# Altium PCB PCB1.PcbDoc
Units mil, origin at the board's own origin, x right, y up, seen from the top; angles counter-clockwise.
Board outline 2045 x 3100 mil, 4 copper layers (L1, L2, L3, L4), stack 62.315 mil thick; 56 components, 27 nets, 155 pads, 92 vias.
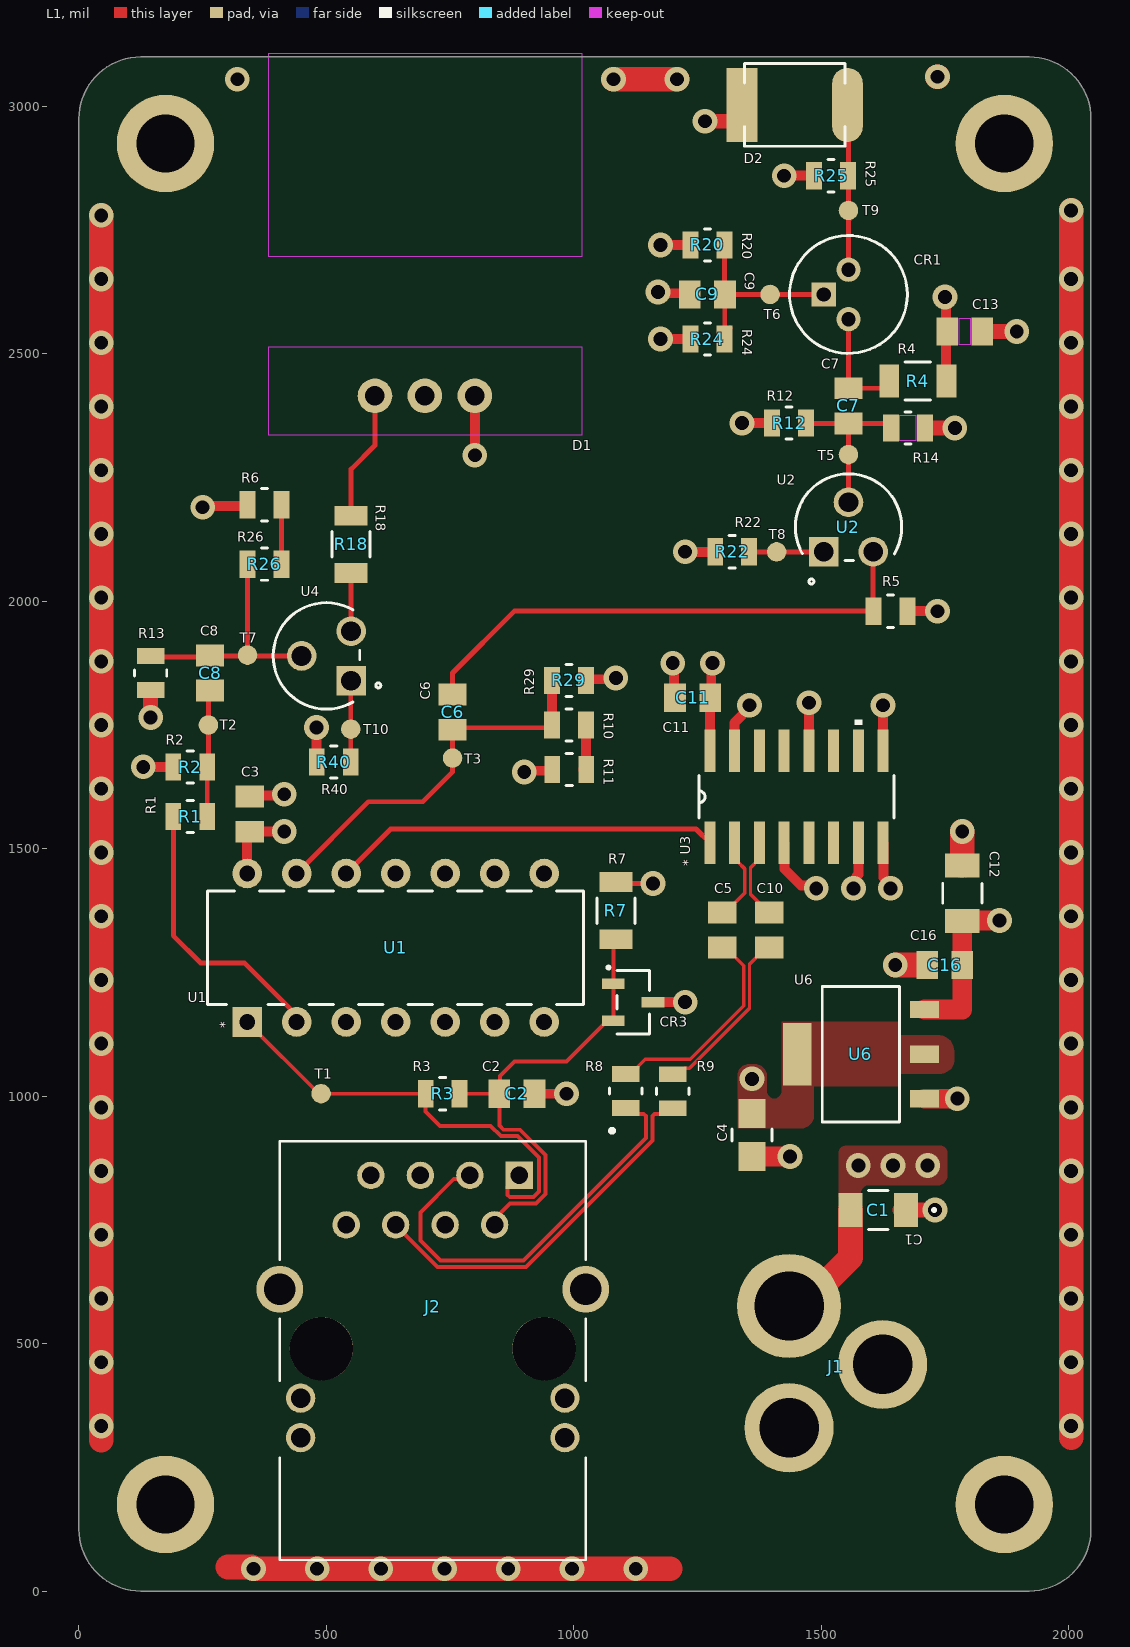
[diagram p0: L1 view]
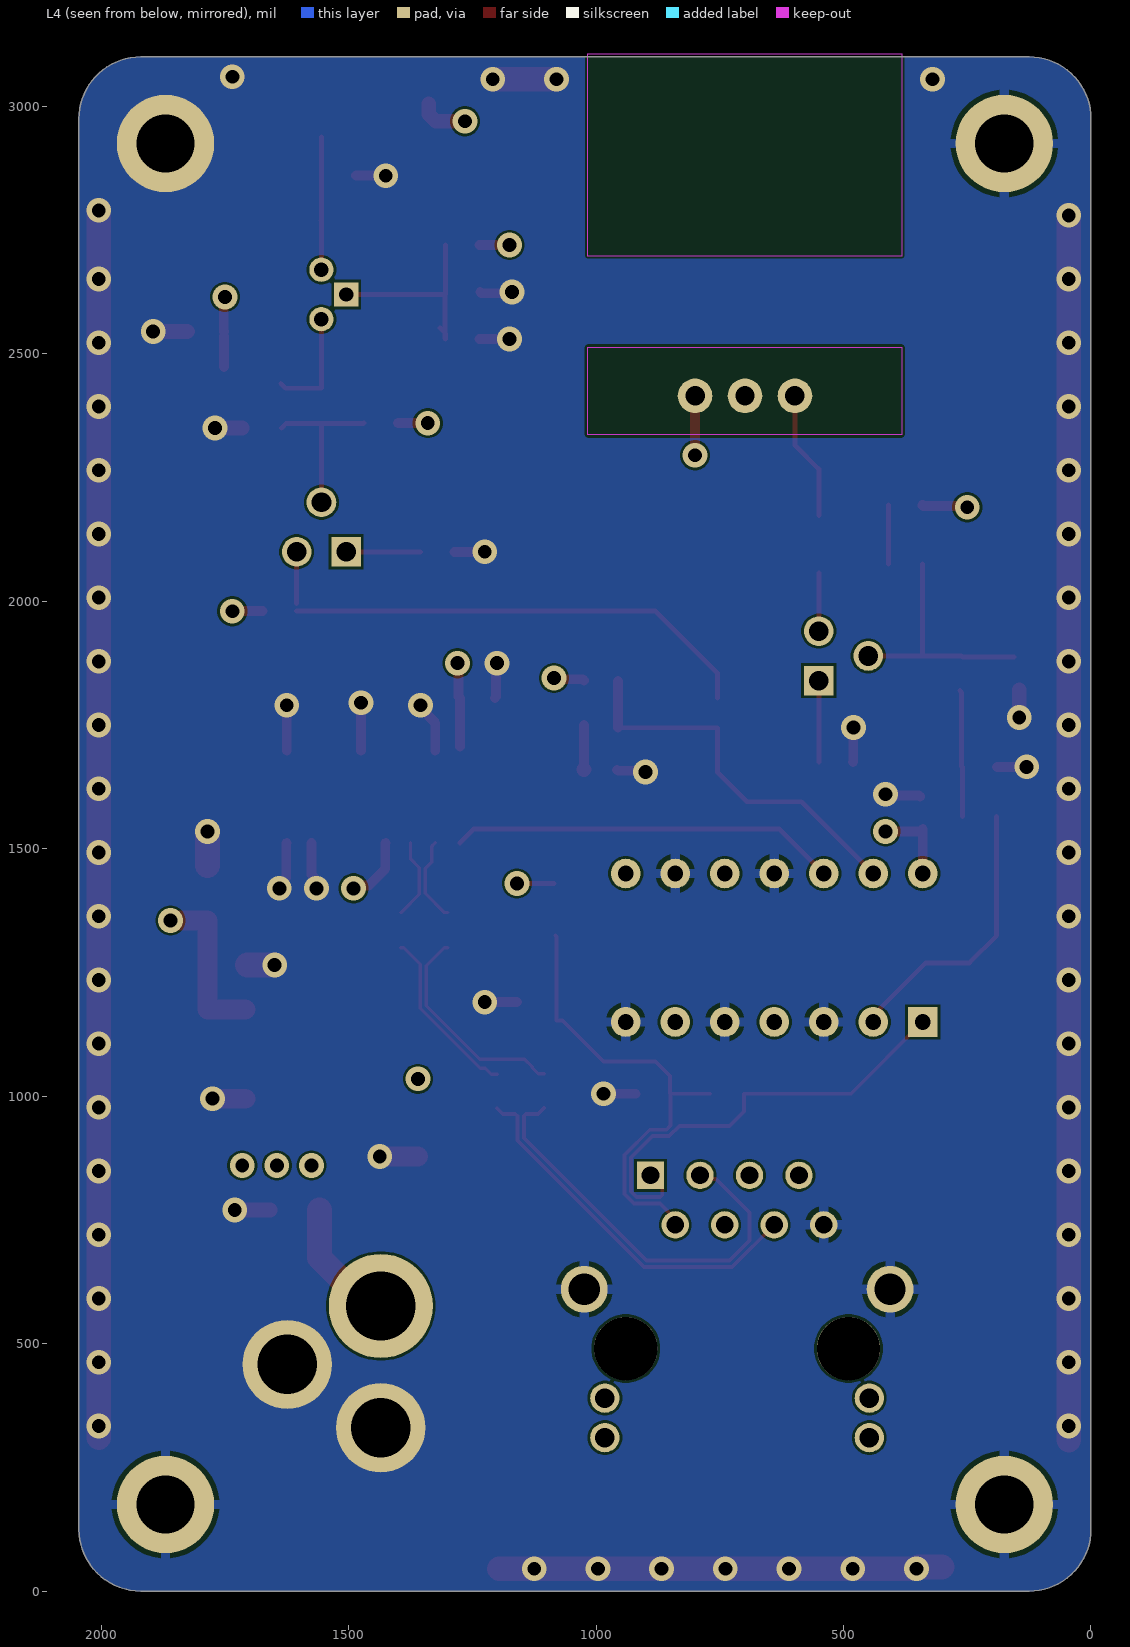
[diagram p1: L4 view, seen from below]
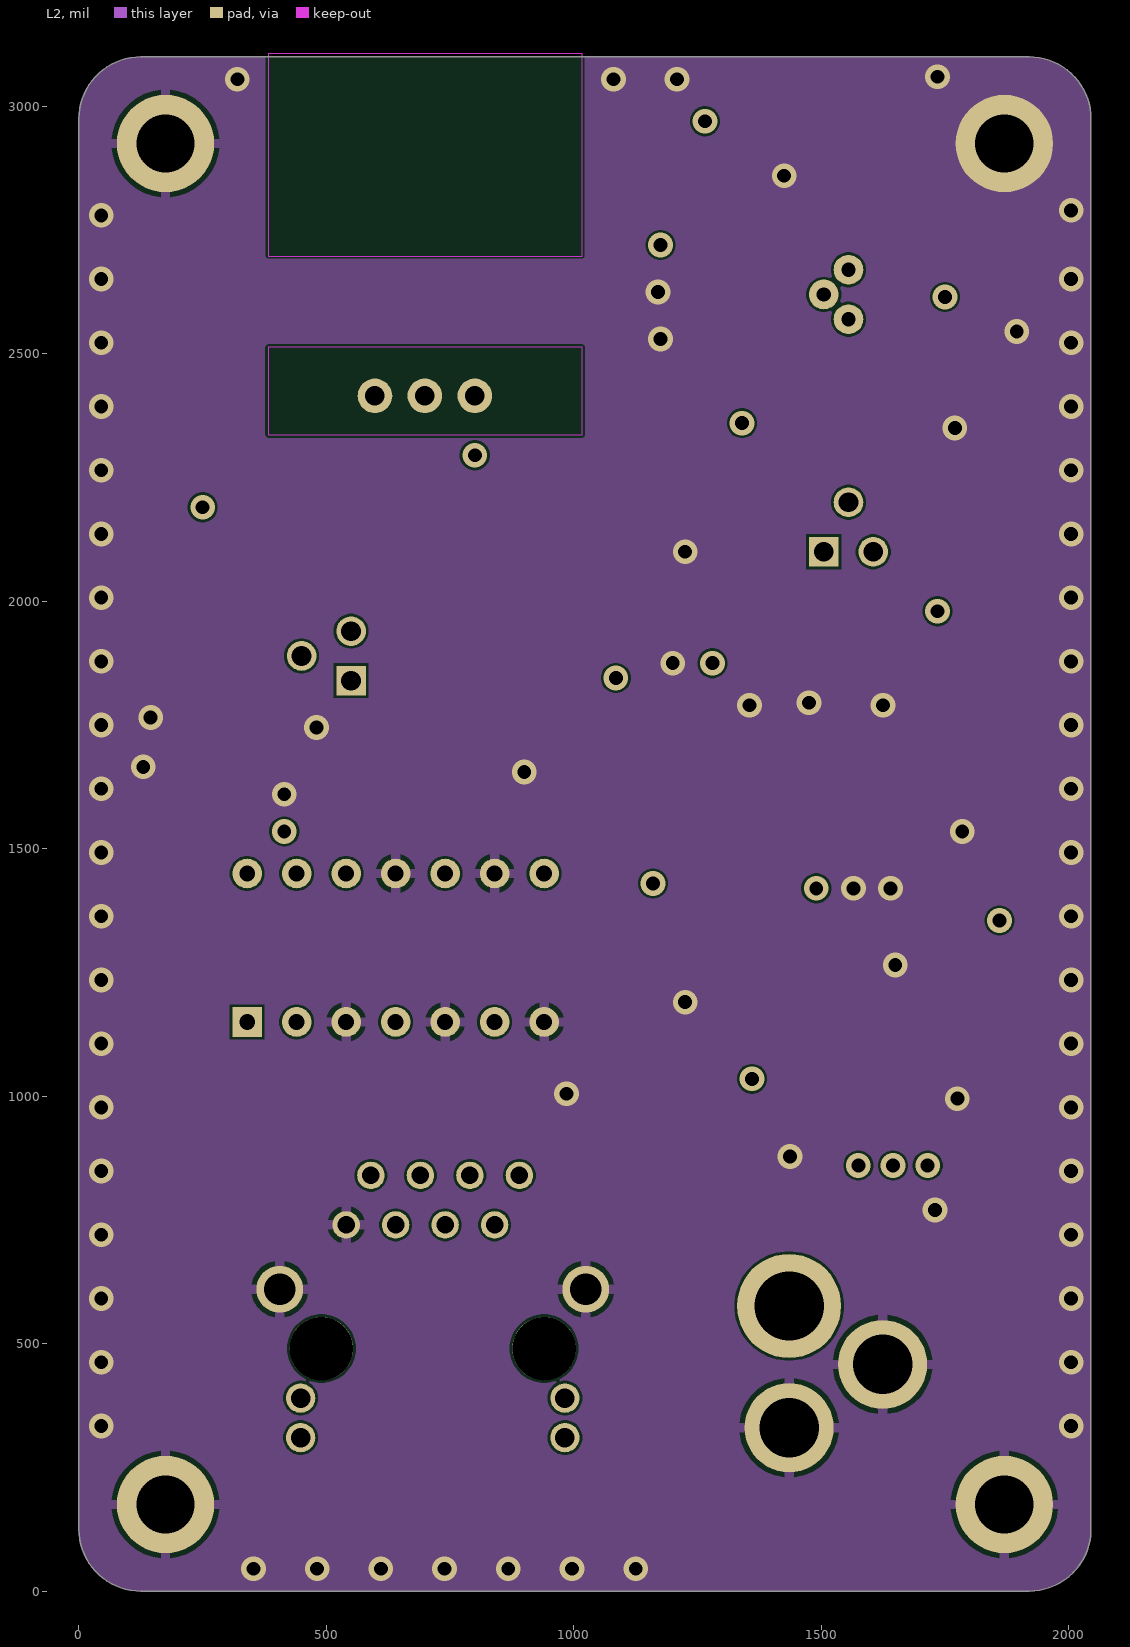
[diagram p2: L2]
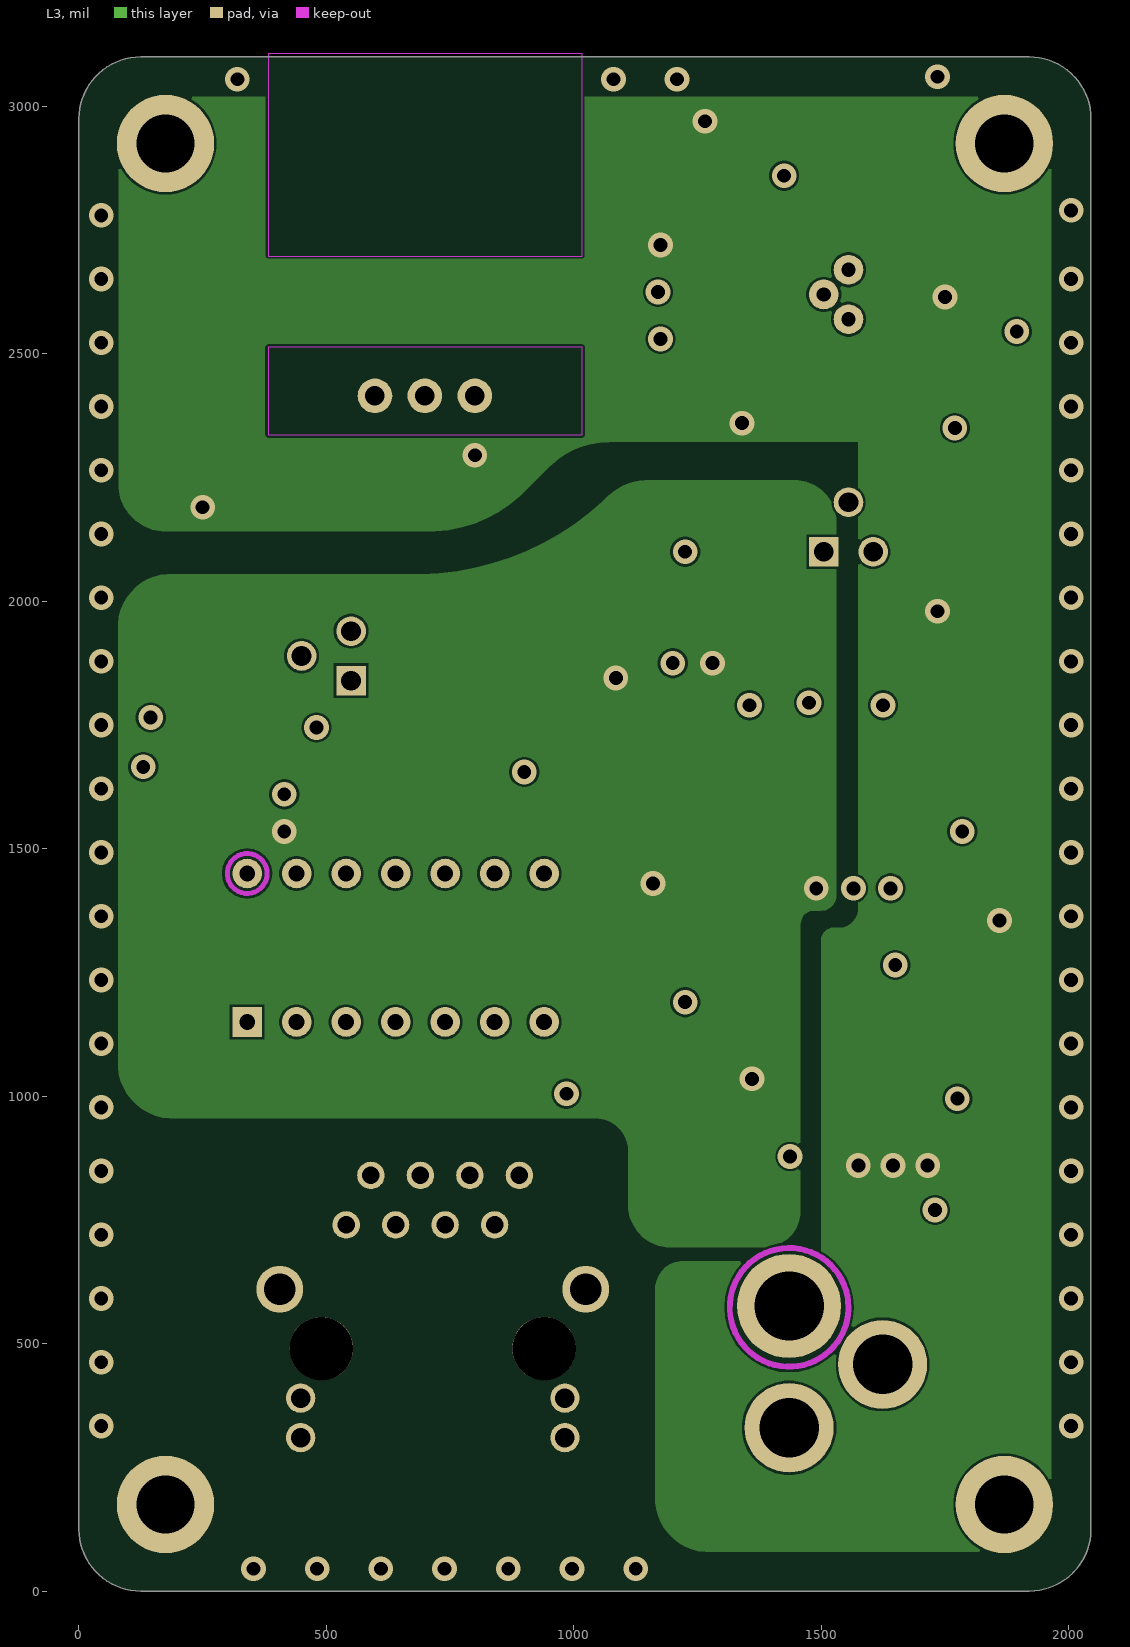
[diagram p3: L3]
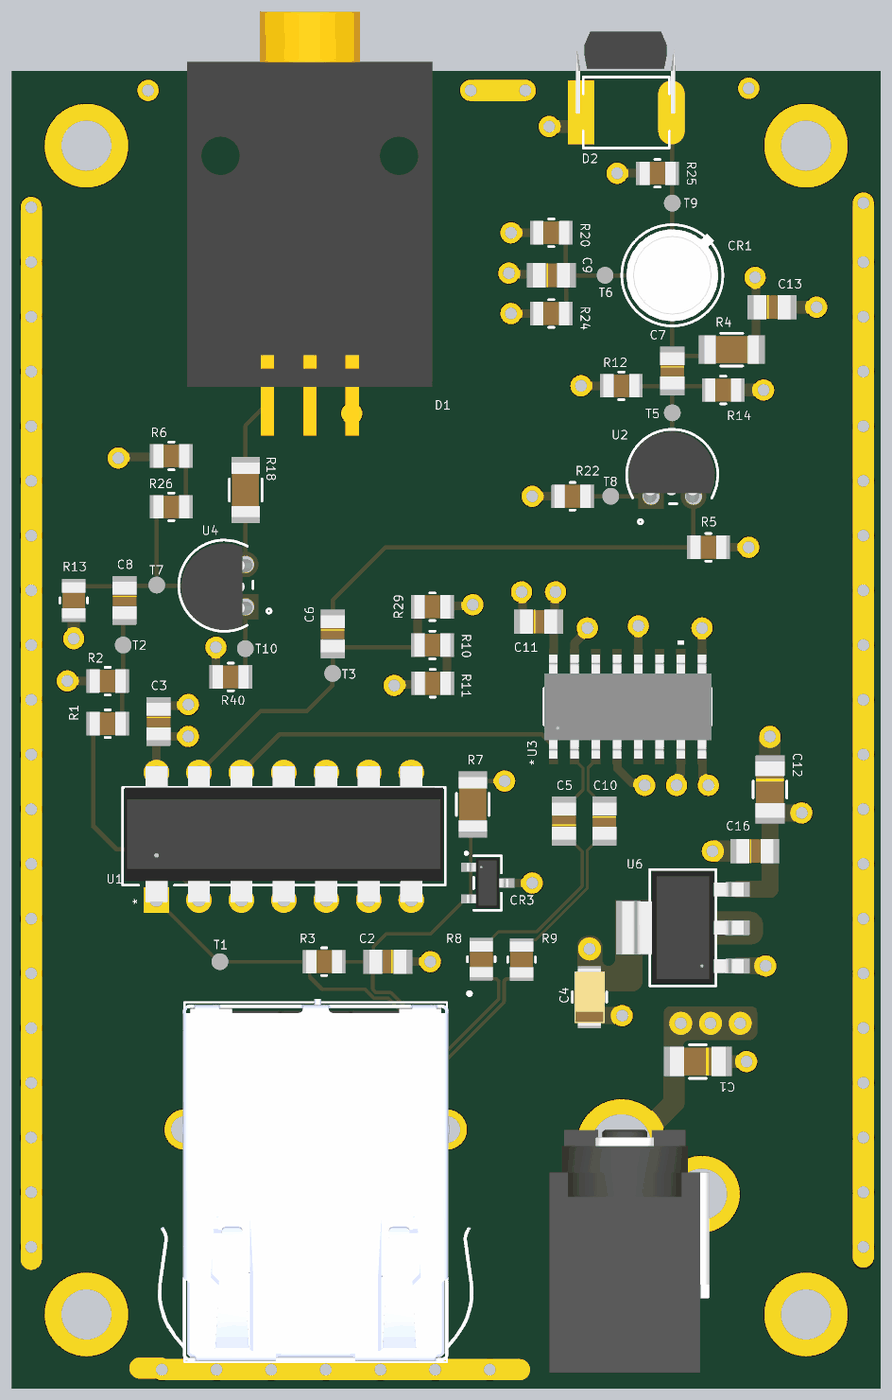
[diagram p4: 3D render of the assembled board from above, using the file's embedded part models]

## Layer stack, top to bottom
Top Solder: solder mask 0.4, Solder Resist, Dk 3.5
L1: signal copper 1.378
Dielectric 2: prepreg 8.126, PP-003, Dk 4.4
L2: signal copper 0.689
Dielectric 1: dielectric 41.929, FR-4, Dk 4.6
L3: signal copper 0.689
Dielectric 3: prepreg 8.126, PP-003, Dk 4.4
L4: signal copper 1.378
Bottom Solder: solder mask 0.4, Solder Resist, Dk 3.5

## Board outline
2045,125 2045,2975 ccw(c1920,2975) 1920,3100 125,3100 ccw(c124.99,2975.01) 0,2975 0,125 ccw(c125,125) 125,0 1920,0 ccw(c1920,125)

## Design rules (kind name [scope] priority, off if disabled: settings)
BoardOutlineClearance [All] p1: gap=0 ignorepadtopadclearanceinfootprint=FALSE
Clearance [All] p1: gap=5 ignorepadtopadclearanceinfootprint=FALSE
ComponentClearance [All] p1: gap=10 collisioncheckmode=3 verticalgap=4 showdistances=TRUE
DiffPairsRouting DifferentialPairClass('Ethernet') [All] p1: maxlimit=5 minlimit=5 mostfreqgap=5 toplayer_minwidth=7 toplayer_maxwidth=7.93 toplayer_prefwidth=7 bottomlayer_minwidth=7 bottomlayer_maxwidth=7.93 bottomlayer_prefwidth=7 impedanceprofiledriven=TRUE impedanceprofileid={C591E4D6-9860-4636-BA8F-E2309DADE294} impedanceprofilevalue=100.000000 maxuncoupledlength=5905.51
DiffPairsRouting [All] p2: maxlimit=100 minlimit=5 mostfreqgap=8 toplayer_minwidth=5 toplayer_maxwidth=71497.94 toplayer_prefwidth=6 midlayer1_minwidth=5 midlayer1_maxwidth=71497.94 midlayer1_prefwidth=6 midlayer2_minwidth=5 midlayer2_maxwidth=71497.94 midlayer2_prefwidth=6 bottomlayer_minwidth=5 bottomlayer_maxwidth=71497.94 bottomlayer_prefwidth=6 maxuncoupledlength=500
Height [All] p1: minheight=0 maxheight=71497.94 prefheight=500
HoleSize [All] p1: absolutevalues=TRUE maxlimit=248.03 minlimit=11.81 maxpercent=80.000 minpercent=20.000
HoleToHoleClearance HoleToHoleClearanceVias [IsVia vs IsVia] p1: gap=9.84 allowstackedmicrovias=FALSE
HoleToHoleClearance [All] p2: gap=17.72 allowstackedmicrovias=FALSE
MinimumAnnularRing MinimumAnnularRingVias [IsVia] p1: minimumring=5.91
MinimumAnnularRing [All] p2: minimumring=7.87
MinimumSolderMaskSliver [All] p1: minsoldermaskwidth=3.94
PlaneClearance [All] p1: clearance=11.81
PlaneConnect PlaneConnectPowerPads [InPadClass('PowerPads')] p1: planeconnectstyle=Direct reliefexpansion=20 reliefentries=4 reliefconductorwidth=10 reliefairgap=10
PlaneConnect [All] p2: pad.planeconnectstyle=Relief pad.reliefexpansion=11.81 pad.reliefentries=4 pad.reliefconductorwidth=10 pad.reliefairgap=10 via.planeconnectstyle=Direct via.reliefexpansion=11.81 via.reliefentries=4 via.reliefconductorwidth=5 via.reliefairgap=5
PolygonConnect PolygonConnectPowerPads [All vs (InPadClass('PowerPads'))] p1: connectstyle=Direct reliefconductorwidth=10 reliefentries=4 polygonreliefangle="90 Angle" airgapwidth=10
PolygonConnect [All] p2: thpad.connectstyle=Relief thpad.reliefconductorwidth=20 thpad.reliefentries=4 thpad.polygonreliefangle="90 Angle" thpad.airgapwidth=10 smdpad.connectstyle=Direct smdpad.reliefconductorwidth=10 smdpad.reliefentries=4 smdpad.polygonreliefangle="90 Angle" smdpad.airgapwidth=10 via.connectstyle=Direct via.reliefconductorwidth=5 via.reliefentries=4 via.polygonreliefangle="90 Angle" via.airgapwidth=5
RoutingVias [All] p1: holewidth=11.81 width=23.62 viastyle="Through Hole" minholewidth=11.81 minwidth=23.62 maxholewidth=248.03 maxwidth=257.87
SilkToSilkClearance [All] p1: silktosilkclearance=5.91
SilkToSolderMaskClearance [IsPad] p1: minsilkscreentomaskgap=5.91 clearancetoexposedcopper=TRUE
SolderMaskExpansion [All] p1: expansion=2 istentingtop=FALSE
SupplyNets "Schematic Supply Nets" [InNet('GND')] p1: voltage=0.000
Width [All] p1: maxlimit=71497.94 minlimit=5 preferedwidth=10
20 further rules are at their usual default settings.

## Classes and differential pairs
differential pair TD: +TD_P -TD_N
differential pair RD: +RD_P -RD_N

## Components (designator, comment, footprint, x,y, rotation, side; value= is the part's Value field where it differs from the comment)
C1 "10uF" CAP_UMK316ABJ475KLHT_TAY 1615,770 r180 top
C2 "100nF" CAP_0805J_AVX#1 885,1005 r180 top
C3 "100nF" CAP_0805J_AVX#1 345,1570 r270 top
C4 "10uF" CAP_TRJ-A-1206_AVX 1360,921.48 r90 top
C5 "100nF" CAP_0805J_AVX#1 1300,1335.68 r90 top
C6 "10nF" CAP_0805J_AVX#1 755,1776.08 r270 top
C7 "10nF" CAP_0805J_AVX#1 1555,2395 r270 top
C8 "100nF" CAP_0805J_AVX#1 265,1855 r270 top
C9 "100nF" CAP_0805J_AVX#1 1270,2620 r0 top
C10 "100nF" CAP_0805J_AVX#1 1395,1335.68 r270 top
C11 "100nF" CAP_0805J_AVX#1 1240,1805 r0 top
C12 "10uF" CAP_UMK316ABJ475KLHT_TAY 1785,1410 r270 top
C13 "100nF" CAP_0805J_AVX#2 1790,2545 r0 top
C16 "100nF" CAP_0805J_AVX#1 1749.5,1265 r0 top
CR1 "2N2222A" TO-18_STM 1505,2620 r0 top
CR3 "TL431AMFDT,215" TL431AMFDT,215_NEX 1120,1190 r270 top
D1 "Laser Module" "5V Laser Module" 417.09,2366.26 r0 top
D2 "BPW34" BPW34 1340,3003 r0 top
J1 "RAPC732X" RAPC732X 1623.98,457.95 r0 top
J2 "ARJM11C7-009-AB-EW2" ARJM11C7009ABEW2 715,490 r0 top
R1 "680" RES_CRGCQ0805_TEC#1 225,1565 r180 top
R2 "680" RES_CRGCQ0805_TEC#1 225,1665 r0 top
R3 "100" RES_CRGCQ0805_TEC#1 735,1005 r180 top
R4 "330" RES_CRGP1206F10R_TEC 1695,2445 r0 top
R5 "1k" RES_CRGCQ0805_TEC#1 1640,1980 r0 top
R6 "1k" RES_CRGCQ0805_TEC#1 375,2195 r180 top
R7 "1K" RES_CRGP1206F10R_TEC 1085,1375 r90 top
R8 "14" RES_CRGCQ0805_TEC#1 1105,1010.68 r270 top
R9 "14" RES_CRGCQ0805_TEC#1 1200,1010 r270 top
R10 "5.1k" RES_CRGCQ0805_TEC#1 990,1750 r180 top
R11 "2k" RES_CRGCQ0805_TEC#1 990.68,1660 r0 top
R12 "10K" RES_CRGCQ0805_TEC#1 1435,2360 r180 top
R13 "1k" RES_CRGCQ0805_TEC#1 145,1855 r90 top
R14 "680" RES_CRGCQ0805_TEC#2 1675,2350 r0 top
R18 "14" RES_CRGP1206F10R_TEC 550,2115 r90 top
R20 "3.9k" RES_CRGCQ0805_TEC#1 1270,2720 r180 top
R22 "30" RES_CRGCQ0805_TEC#1 1320,2100 r0 top
R24 "10K" RES_CRGCQ0805_TEC#1 1270,2530 r0 top
R25 "2K" RES_CRGCQ0805_TEC#1 1520,2860 r0 top
R26 "5.1k" RES_CRGCQ0805_TEC#1 375,2075 r0 top
R29 "10K" RES_CRGCQ0805_TEC#1 990,1840 r0 top
R40 "47" RES_CRGCQ0805_TEC#1 515,1675 r0 top
T1 "Test point" "Test point" 489.47,1005 r0 top
T2 "Test point" "Test point" 261.64,1750 r0 top
T3 "Test point" "Test point" 755,1683.18 r0 top
T5 "Test point" "Test point" 1555,2296.35 r0 top
T6 "Test point" "Test point" 1396.65,2620 r0 top
T7 "Test point" "Test point" 340.68,1891.18 r0 top
T8 "Test point" "Test point" 1410,2100 r0 top
T9 "Test point" "Test point" 1555,2789.76 r0 top
T10 "Test point" "Test point" 549.32,1741.55 r90 top
U1 "74HC14" 74HC14 340,1150 r90 top
U2 "2N3904" TO-92_2 1605,2200 r0 top
U3 "AM26C31MDREP" D16 1450,1605 r90 top
U4 "2N3904" TO-92_2 450,1939.66 r90 top
U6 "AMS1117-5.0" SOT_AMS1117-2.5_AMS 1580,1085 r90 top

## Footprints (in the part's own frame and the unit in brackets; to place one, negate y for a bottom-side part, rotate by r counter-clockwise, add the part's x,y. Pads: shape width x height; smd on the part's side, far side on the other; paste and mask are expansions set on the pad)
"5V Laser Module" [mil]
  round 70 hole 39.37: 1(382.91,48.74) 2(282.01,48.74) 3(181.1,48.74)
  Keep-Out Layer region: -35,-30 600,-30 600,147.48 -35,147.48
  Keep-Out Layer region: -35,331.3 600,331.3 600,740 -35,740
  body extent -5,-123 573,873, height 312
74HC14 [mil]
  rect 60x60 hole 32 paste-99999 mask+0: 1(0,0)
  round 60 hole 32 paste-99999 mask+0: 2(0,-100) 3(0,-200) 4(0,-300) 5(0,-400) 6(0,-500) 7(0,-600) 8(300,-600) 9(300,-500) 10(300,-400) 11(300,-300) 12(300,-200) 13(300,-100) 14(300,0)
  silkscreen extent 35,-680 265,80, body extent -5,-675 315,75, height 205
ARJM11C7009ABEW2 [mm]
  rect 1.408x1.408 / inner round 1.408 / far side rect 1.408x1.408 hole 0.9: 1(4.445,8.89)
  round 1.408 hole 0.9: 2(3.175,6.35) 3(1.905,8.89) 4(0.635,6.35) 5(-0.635,8.89) 6(-1.905,6.35) 7(-3.175,8.89) 8(-4.445,6.35)
  round 1.508 hole 1: 9(-6.785,-2.54) 10(-6.785,-4.57) 11(6.785,-2.54) 12(6.785,-4.57)
  round 2.4 hole 1.6: S1(-7.85,3.05) S2(7.85,3.05)
  round 3.25 hole 3.25 unplated: ""(-5.715,0) ""(5.715,0)
  silkscreen extent -7.85,-10.85 9.3,11.28, body extent -9.45,-10.79 9.45,10.85, height 15.3
BPW34 [mil]
  rect 62x150 smd paste-99999 mask+0: 1(0,0)
  oval 62x150 smd paste-99999 mask+0: 2(213,0)
  silkscreen extent 5,-84 208,84, body extent -11,-2 221,190, height 99
CAP_0805J_AVX#1 [mil]
  rect 44x57 smd paste+0 mask+0: 1(-35.5,0) 2(35.5,0)
  body extent -44,-29 44,29, height 37
CAP_0805J_AVX#2 [mil]
  rect 44x57 smd paste+0 mask+0: 1(-35.5,0) 2(35.5,0)
  L1 keep-out region: -11.5,-26.5 -11.5,26.5 11.5,26.5 11.5,-26.5
  body extent -44,-29 44,29, height 37
CAP_TRJ-A-1206_AVX [mil]
  rect 58.96x55 smd paste+0 mask+0: 1(-43.52,0) 2(43.52,0)
  silkscreen extent -12,-40 12,40, body extent -67,-36 67,36, height 73
CAP_UMK316ABJ475KLHT_TAY [mil]
  rect 48x69 smd paste+0 mask+0: 1(-56,0) 2(56,0)
  silkscreen extent -116,-40 20,40, body extent -66,-34 66,34, height 71
D16 [mil]
  rect 86x22 smd paste-43 mask-43: 1(-93,175) 2(-93,125) 3(-93,75) 4(-93,25) 5(-93,-25) 6(-93,-75) 7(-93,-125) 8(-93,-175) 9(93,-175) 10(93,-125) 11(93,-75) 12(93,-25) 13(93,25) 14(93,75) 15(93,125) 16(93,175)
  silkscreen extent -43,-197 156,197, body extent -122,-197 122,197, height 69
RAPC732X [mm]
  round 4.575 hole 3.05: 1(0,0) 2(-4.8,-3.25)
  round 5.34 hole 3.56: 3(-4.8,3)
  body extent -9.09,-10.67 0.46,3.83, height 10.83
RES_CRGCQ0805_TEC#1 [mil]
  rect 32x55 smd paste+0 mask+0: 1(-34.32,0) 2(34.32,0)
  silkscreen extent -6,-32 6,32, body extent -42,-27 42,27, height 26
RES_CRGCQ0805_TEC#2 [mil]
  rect 32x55 smd paste+0 mask+0: 1(-34.32,0) 2(34.32,0)
  L1 keep-out region: -16.32,-25.5 -16.32,25.5 16.32,25.5 16.32,-25.5
  silkscreen extent -6,-32 6,32, body extent -42,-27 42,27, height 26
RES_CRGP1206F10R_TEC [mil]
  rect 39.78x67 smd paste+0 mask+0: 1(-57.89,0) 2(57.89,0)
  silkscreen extent -26,-38 26,38, body extent -64,-34 64,34, height 26
SOT_AMS1117-2.5_AMS [mil]
  rect 35x58 smd paste+0 mask+0: 1(-90.16,-128.5) 2(0,-128.5) 3(90.16,-128.5)
  rect 126x58 smd paste+0 mask+0: 4(0,128.5)
  silkscreen extent -137,-78 137,78, body extent -132,-144 132,144, height 71
"Test point" [mm]
  round 1 smd mask+0: 3(0,0)
TL431AMFDT,215_NEX [mil]
  rect 21.36x45.56 smd paste+0 mask+0: 1(-37.4,-40) 2(37.4,-40) 3(0,40)
  silkscreen extent -73,-53 64,33, body extent -59,-49 59,49, height 43
TO-18_STM [mil]
  rect 49x49 / inner round 60 / far side rect 49x49 hole 29 paste-99999 mask+0: 1(0,0)
  round 49 / inner round 60 / far side round 49 hole 29 paste-99999 mask+0: 2(50,-50) 3(50,50)
  silkscreen extent -69,-119 169,119, body extent -103,-153 216,166, height 323
TO-92_2 [mil]
  rect 60x60 hole 40 paste-99999 mask-30: 1(-100,-100)
  round 60 hole 40 paste-99999 mask-30: 2(-50,0) 3(0,-100)
  silkscreen extent -157,-165 58,57, body extent -155,-115 50,52, height 360

## Part data
C1 C12: library part "1206 cap", "No Description Available", Manufacturer_Name="TAIYO YUDEN", Manufacturer_Part_Number=UMK316B7105KLHT, Copyright="Copyright (C) 2026 Ultra Librarian. All rights reserved."
C2 C3 C5 C6 C7 C8 C9 C10 C11 C13 C16: library part "0805 cap", "Description", Manufacturer_Name="KYOCERA AVX", Manufacturer_Part_Number=08051A8R2CAT2A, Copyright="Copyright (C) 2026 Ultra Librarian. All rights reserved."
C4: library part "10uF case-A 3216 cap", "Description", Manufacturer_Name="KYOCERA AVX", Manufacturer_Part_Number=TRJA224K035R6000, Copyright="Copyright (C) 2026 Ultra Librarian. All rights reserved."
CR1: "Description", Manufacturer_Name=STMicroelectronics, Copyright="Copyright (C) 2025 Ultra Librarian. All rights reserved.", Manufacturer_Part_Number=2N2222A
CR3: "Description", Manufacturer_Name=Nexperia, Copyright="Copyright (C) 2025 Ultra Librarian. All rights reserved.", Manufacturer_Part_Number=TL431AMFDT,215, RefDes=RefDes, Type=Type
D1: library part "5V Laser Module"
J1: Manufacturer_Name=Switchcraft, Arrow_Part_Number=RAPC732X, Arrow_Price-Stock=https://www.arrow.com/en/products/rapc732x/switchcraft?region=nac, ComponentLink1Description=Supplier, ComponentLink1URL=https://makerselectronics.com/product/dc-power-jack-female-socket-connector-5-5mmx2-1mm/, DeviceSetName=RAPC732X, GateName_1=G$1, Height=11mm, LibraryName=RAPC732X, Manufacturer_Part_Number=RAPC732X, Mouser_Part_Number=502-RAPC732X, Mouser_Price-Stock=https://www.mouser.co.uk/ProductDetail/Switchcraft/RAPC732X?qs=mcPJWgAPNrf44q5B71nLHg%3D%3D, Package=RAPC732X, SymbolName_1=RAPC732X
J2: "Modular Connector, 100 Base-T, RJ45 Jack, 1 x 1 (Port), 8P8C, Through Hole Mount", Inductance=350µH, Manufacturer="Abracon LLC", Max Operating Temperature=85°C, Min Operating Temperature=-40°C, Supplier Part Number 1=535-14159-ND, Category="Modular / Ethernet Connectors", China RoHS=Compliant, ComponentLink1Description=https://datasheet.octopart.com:443/ARJM11C7-009-AB-EW2-Abracon-datasheet-182207866.pdf?src-supplier=IHS, ComponentLink1URL=https://datasheet.octopart.com:443/ARJM11C7-009-AB-EW2-Abracon-datasheet-182207866.pdf?src-supplier=IHS, ComponentLink2Description=https://datasheet.octopart.com:443/ARJM11C7-009-AB-EW2-Abracon-datasheet-97040553.pdf?src-supplier=Electro+Sonic, ComponentLink2URL=https://datasheet.octopart.com:443/ARJM11C7-009-AB-EW2-Abracon-datasheet-97040553.pdf?src-supplier=Electro+Sonic, ComponentLink3Description=https://datasheet.octopart.com:443/ARJM11C7-009-AB-EW2-Abracon-datasheet-115391515.pdf?src-supplier=Abracon+SCT, ComponentLink3URL=https://datasheet.octopart.com:443/ARJM11C7-009-AB-EW2-Abracon-datasheet-115391515.pdf?src-supplier=Abracon+SCT, ComponentLink4Description=http://sigma.octopart.com:80/conflict_mineral_statement/Abracon-company-27.pdf?src-supplier=Compliance+Statements, ComponentLink4URL=http://sigma.octopart.com:80/conflict_mineral_statement/Abracon-company-27.pdf?src-supplier=Compliance+Statements, Contact Gender=Female, Contact Plating=Gold, Height=13.8mm, Length=21.3mm, Lifecycle Status=Production, Manufacturer Part Number=ARJM11C7-009-AB-EW2, Mount="Through Hole", Mounting Type="Through Hole", Number of Pins=8, Number of Ports=1, Number of Rows=2, Plating Thickness=152.4nm, Pricing 1="1=3.05, 10=2.592, 25=2.4292, 50=2.3132, 100=2.2026, 250=2.06468, 500=1.96614, 2000=1.78304, 4000=1.76355 (USD)", REACH SVHC=No, RoHS=Compliant, Row Spacing=2.54mm, Shell Finish=Nickel, Shell Material=Brass, Stock 1=4998, Supplier 1=DigiKey, Terminal Pitch=2.54mm, Width=15.9mm
R1 R2 R3 R5 R6 R8 R9 R10 R11 R12 R13 R14 R20 R22 R24 R25 R26 R29 R40: library part "0805 resistor", "CRGCQ 0805 120K 1%", Manufacturer_Name="TE Connectivity", Manufacturer_Part_Number=CRGCQ0805F120K, Copyright="Copyright (C) 2026 Ultra Librarian. All rights reserved."
  R8 R9: ComponentLink1Description=Supplier, ComponentLink1URL=https://ampere-electronics.com/product/0ohm-smd-resistor-0-125w-0805-2012m/
R4 R7 R18: library part "1206 resistor", "CRGP 1206 10R 1%", Manufacturer_Name="TE Connectivity", Manufacturer_Part_Number=CRGP1206F10R, Copyright="Copyright (C) 2025 Ultra Librarian. All rights reserved.", Type="Chip Resistor - Surface Mount"
U1: "Description", Manufacturer_Name="Texas Instruments", Copyright="Copyright (C) 2026 Ultra Librarian. All rights reserved.", Manufacturer_Part_Number=74HC14
U2 U4: "Description", Manufacturer_Name=onsemi, Copyright="Copyright (C) 2025 Ultra Librarian. All rights reserved.", Manufacturer_Part_Number=2N3904, RefDes=RefDes, Type=Type
U3: "Enhanced Product quadruple differential line driver 16-SOIC -55 to 125", Manufacturer_Name="Texas Instruments", Copyright="Copyright (C) 2025 Ultra Librarian. All rights reserved.", Manufacturer_Part_Number=AM26C31MDREP, RefDes=RefDes, Type=Type
U6: "Description", Manufacturer_Name="ams OSRAM", Copyright="Copyright (C) 2025 Ultra Librarian. All rights reserved.", Manufacturer_Part_Number=AMS1117-5.0, RefDes=RefDes, Type=Type

## Free pads (board coordinates)
  round 196.85 hole 118.11: 2(175,2925) 2(175,175) 2(1870,2925) 2(1870,175)

## Via types
v1: diameter 50, hole 28, L1 to L4, 92 vias

## Nets (pads, with @x,y where several pads share a name; then routed paths per layer and width w, separated by ;. In a path a pad name is that pad's centre, name@x,y a point inside that pad or via, vN(x,y) a via of type N, cw(c..) or ccw(c..) an arc to the next point about the centre after c; other vN are vias at no path point)
5V: C3.2 C4.2 C11.2 R7.2 R29.2 U1.14 U3.4 U3.16 U6.2 U6.4 | length 602.1
  L1 w10: R7.2@1085,1430 v1(1160,1430)
  L1 w20: U1.14 C3.2@340,1540 ; C3.2@345,1535 v1(415,1535) ; R29.2 1026.82,1842.5 1082.5,1842.5 v1(1085,1845) ; U3.16@1275,1706.3 1275.25,1706.55 1275.25,1804.75 C11.2 1277.75,1807.25 1277.75,1872.75 v1(1280,1875) ; U3.4 1426,1511 1426,1459 1459.26,1425.74 1484.26,1425.74 v1(1490,1420)
  other v1: 1360,1035
12V: C1.2 C12.2 C13.1 C16.2 D1.1 D2.1 J1.3 R4.2 R5.2 R6.2 R12.2 R20.2 U6.3 | length 1227
  L1 w20: v1(250,2190) 252.5,2192.5 339.68,2192.5 340.68,2193.5 R6.2 ; v1(800,2295) D1.1 ; v1(1175,2720) R20.2 ; v1(1340,2360) R12.2 ; R5.2 v1(1735,1980) ; v1(1750,2615) 1752.25,2612.75 1752.25,2545.14 C13.1@1752.11,2545 ; R4.2@1752.11,2473.5 C13.1@1752.11,2535
  L1 w30: v1(1265,2970) 1324,2970 1338,2984 D2.1@1338,3005
  L1 w40: U6.3 1785,1175.16 C16.2 C12.2 1785,1355 v1(1860,1355)
  L1 w50: J1.3 1473.25,576.06 1473.25,587.62 1559,673.37 C1.2
  other v1: 1575,860 1645,860 1715,860
Ethernet_SCH_OUT: C8.2 R1.1 R2.2 T2.3 | length 256.9
  L1 w10: R1.1 R2.2 261.64,1667.32 T2.3 261.64,1816.14 C8.2
GND: C1.1 C2.1 C3.1 C4.1 C9.1 C11.1 C12.1 C13.2 C16.1 CR3.3 J1.1 J1.2 J2.8 J2.S1 J2.S2 pad.2 R2.1 R11.1 R13.1 R14.2 R22.1 R24.1 R25.1 R40.1 U1.3 U1.5 U1.7 U1.9 U1.11 U3.7 U3.8 U3.9 U3.12 U3.15 U6.1 | length 7696
  L1 w20: v1(130,1665.46) R2.1@190.21,1665.46 ; C3.1 347.25,1607.75 412.75,1607.75 v1(415,1610) ; v1(480,1745) 480.34,1744.66 480.34,1675.34 R40.1 ; v1(900,1655) 902.5,1657.5 955.85,1657.5 R11.1@957.35,1659 ; C2.1 v1(985,1005) ; CR3.3 v1(1225,1190) ; v1(1170,2625) 1172.5,2622.5 1231.5,2622.5 C9.1@1234,2625 ; v1(1175,2530) R24.1 ; v1(1200,1875) 1202.25,1872.75 1202.25,1807.25 C11.1 ; v1(1225,2100) R22.1 ; U3.15 1325,1754.59 1355,1784.59 v1(1355,1790) ; v1(1425,2860) R25.1@1485,2860 ; U3.12 v1(1475,1795) ; v1(1565,1420) 1570.74,1425.74 1570.74,1443.86 1575,1448.12 U3.7 ; U3.8 1626,1511 1626,1442.12 1640,1428.12 v1(1640,1420) ; U3.9 v1(1625,1790)
  L1 w30: v1(145,1765) R13.1 ; C1.1@1658.52,770 C1.1 v1(1730,770) ; R14.2@1715,2350 v1(1770,2350) ; C13.2 v1(1895,2545)
  L1 w40: C4.1 v1(1437.04,877.96) ; U6.1@1708.66,995 v1(1775,995)
  L1 w50: 45,305 v1(45,333.78) v1(45,462.52) v1(45,591.26) v1(45,720) v1(45,848.74) v1(45,977.48) v1(45,1106.22) v1(45,1234.96) v1(45,1363.7) v1(45,1492.44) v1(45,1621.18) v1(45,1749.92) v1(45,1878.66) v1(45,2007.4) v1(45,2136.14) v1(45,2264.88) v1(45,2393.62) v1(45,2522.36) v1(45,2651.1) v1(45,2779.84) ; 301.17,48.83 348.77,48.83 v1(352.6,45) v1(481.34,45) v1(610.08,45) v1(738.82,45) v1(867.56,45) v1(996.3,45) v1(1125.04,45) 1195,45 ; v1(1080,3055) v1(1208.74,3055) ; v1(1649.5,1265) C16.1@1704.5,1265 ; C12.1 v1(1785,1535) ; v1@2005,310 v1(2005,333.78) v1(2005,462.52) v1(2005,591.26) v1(2005,720) v1(2005,848.74) v1(2005,977.48) v1(2005,1106.22) v1(2005,1234.96) v1(2005,1363.7) v1(2005,1492.44) v1(2005,1621.18) v1(2005,1749.92) v1(2005,1878.66) v1(2005,2007.4) v1(2005,2136.14) v1(2005,2264.88) v1(2005,2393.62) v1(2005,2522.36) v1(2005,2651.1) v1(2005,2790)
  other v1: 320.16,3055 1735,3060
NetC5_1: C5.1 R8.1 | length 435
  L1 w7: R8.1 1116.5,1045 1129,1057.5 1129,1059.33 1144.67,1075 1235,1075 1343,1183 1343,1263.68 1306.5,1300.18 C5.1
NetC5_2: C5.2 U3.2 | length 171.6
  L1 w7: C5.2 1306.5,1371.18 1345,1409.68 1345,1460 1332.5,1472.5 1332.5,1504.5 U3.2
NetC6_1: C6.1 R5.1 U2.3 | length 1057.9
  L1 w10: C6.1@755,1804.56 C6.1 755,1855 880,1980 R5.1 ; R5.1@1605,1995 U2.3
NetC7_1: C7.1 CR1.2 R4.1 | length 225.5
  L1 w10: CR1.2 C7.1 1627.61,2430.5 R4.1@1637.11,2440
NetC7_2: C7.2 R12.1 R14.1 T5.3 U2.2 | length 330
  L1 w10: R12.1 1469.82,2359.5 C7.2 ; U2.2 T5.3 C7.2 ; R14.1@1635.68,2350 1626.18,2359.5 C7.2
NetC8_1: C8.1 R13.2 R26.1 T7.3 U4.2 | length 479.6
  L1 w10: R13.2@155,1887.89 260,1887.89 261.77,1889.66 359.21,1889.66 U4.2 ; T7.3 R26.1
NetC9_2: C9.2 CR1.1 R20.1 R24.2 T6.3 | length 412.3
  L1 w10: R20.1 1304.32,2621.18 C9.2 T6.3 CR1.1 ; R24.2@1305,2541.5 1305,2530.68 R24.2 1304.32,2541.5 R24.2@1315.32,2552.5 ; R24.2@1305,2546.5 C9.2@1305,2620
NetC10_1: C10.1 U3.3 | length 164.9
  L1 w7: U3.3 1375,1480 1357,1462 1357,1407.68 1393.5,1371.18 C10.1
NetC10_2: C10.2 R9.1 | length 352.9
  L1 w7: R9.1 1211.5,1044.32 1224,1056.82 1233.79,1056.82 1355,1178.03 1355,1266.68 1388.5,1300.18 C10.2
NetCR1_3: CR1.3 D2.2 R25.2 T9.3 | length 267.7
  L1 w10: CR1.3 1555,2769.32 1555.68,2770 ; T9.3@1555,2770.57 D2.2@1555,2938
NetD1_3: D1.3 R18.2 | length 262.1
  L1 w10: R18.2 550,2266.88 598.19,2315.07 D1.3
NetR1_2: R1.2 U1.2 | length 574
  L1 w10: R1.2 190.68,1324.32 245.68,1269.32 334.21,1269.32 435,1168.53 U1.2@435,1144.09
NetR6_1: R6.1 R26.2 | length 120
  L1 w10: R26.2 R6.1
NetR10_1: R10.1 R11.2 | length 89.8
  L1 w20: R11.2@1024.66,1660.34 R10.1@1024.66,1749.66
  L1 w30: R11.2@1024.66,1660.34 R11.2
NetR18_1: R18.1 U4.3 | length 117.4
  L1 w10: U4.3 R18.1
NetR22_2: R22.2 T8.3 U2.1 | length 150.7
  L1 w10: R22.2 U2.1
NetR40_2: R40.2 T10.3 U4.1 | length 165.6
  L1 w10: R40.2 T10.3 U4.1@549.32,1838.98 ; U4.1@549.32,1839.66 U4.1@549.32,1838.98 ; U4.1 U4.1@549.32,1838.98
Photodiode_SCH_IN: C6.2 R10.2 R29.1 T3.3 U1.13 | length 784.4
  L1 w10: U1.13 585,1595 695,1595 754.57,1654.57 754.57,1682.75 T3.3 C6.2 755,1744.5 R10.2@955.68,1744.5
  L1 w20: R10.2@955.68,1745 R29.1@955.68,1839.32
Photodiode_SCH_OUT: U1.12 U3.1 | length 783.9
  L1 w10: U1.12 630,1540 1247,1540 U3.1
RD_N: J2.6 R9.2 | length 756.8
  L1 w7.93: J2.6 725,655 903.29,655 1158.83,910.54 1158.83,959.67 1163.47,964.32 1188.64,964.32 R9.2
RD_P: J2.3 R8.2 | length 854.7
  L1 w7.93: J2.3 782.42,832.42 757.42,832.42 690,765 690,708.29 730.36,667.93 897.93,667.93 1145.89,915.89 1145.89,959.67 1141.25,964.32 1117.03,964.32 R8.2
TD_N: C2.2 CR3.1 CR3.2 J2.2 R3.1 R7.1 | length 961.9
  L1 w7.93: R3.1 C2.2 ; J2.2 840,752.12 870.9,783.02 923.57,783.02 942.55,802 942.55,881.09 891.52,932.12 857.88,932.12 849.5,940.5 C2.2 ; R7.1@1082.11,1325 1080,1322.89 CR3.1 CR3.2 1067.9,1152.6 985.3,1070 880,1070 850.75,1040.75 850.75,1006.25 C2.2
TD_P: J2.1 R3.2 U1.1 | length 911.8
  L1 w7.93: U1.1 485,1005 R3.2 700.68,969.32 730,940 831.71,940 852.52,919.19 886.16,919.19 929.62,875.74 929.62,807.36 918.21,795.95 870.9,795.95 866.25,800.6 866.25,816.25 J2.1
pads on no net: D1.2 J2. J2.4 J2.5 J2.7 J2.9 J2.10 J2.11 J2.12 T1.3 U1.4 U1.6 U1.8 U1.10 U3.5 U3.6 U3.10 U3.11 U3.13 U3.14

## Polygon pours and split planes (outlines as drawn)
12V on L3 "12V_L03_P006" (solid, pour order 6): 175.71,2141.29 706.36,2141.29 ccw(c706.36,2415.64) 900.36,2221.64 950.25,2271.54 cw(c1070.32,2151.51) 1070.36,2321.29 1575,2321.29 1575,1380 cw(c1535,1380) 1535,1340 1525,1340 ccw(c1525,1315) 1500,1315 1500,666.29 1220,666.29 ccw(c1219.98,611.3) 1165,611.29 1165,187 ccw(c1273,187) 1273,79 1845,79 ccw(c1845,199) 1965,199 1965,2882 ccw(c1828,2882) 1828,3019 221,3019 ccw(c221,2878) 80,2878 80,2237 ccw(c175.71,2237)
5V on L3 "5V_L03_P009" (solid, remove dead copper, pour order 9): 1110,779.99 1110,890 ccw(c1045.01,890) 1045,955 190,955 cw(c190,1066) 79,1066 79,1948 cw(c186,1948) 186,2055 673.09,2055 ccw(c682.3,2609.41) 1069.84,2212.84 cw(c1148.75,2132.11) 1148.78,2245 1445,2245 cw(c1445,2160) 1530,2160 1530,1405 cw(c1500,1405) 1500,1375 1485,1375 ccw(c1485,1347.96) 1457.96,1347.96 1457.96,767.68 cw(c1384.75,768.21) 1384.74,695 1195,695 cw(c1194.99,779.99)
5V on L1 "direct" (solid, pour order 13): 1355,1065 1365,1065 cw(c1365,1040) 1390,1040 1390,1010 ccw(c1405,1010) 1405,995 ccw(c1405,1010) 1420,1010 1420,1150 1655,1150 1655,1122.9 1737.1,1122.9 cw(c1737.1,1091.58) 1768.42,1091.58 1768.42,1073.42 cw(c1740.8,1073.42) 1740.8,1045.8 1655,1045.8 1655,1020 1485,1020 1485,960 cw(c1460,960) 1460,935 1330.85,935 1330.85,1040.85 cw(c1355,1040.85)
12V on L1 "direct" (solid, pour order 14): 1535,735 1535,885 cw(c1550,885) 1550,900 1580,900 1740,900 cw(c1740,885) 1755,885 1755,840 cw(c1735,840) 1735,820 1595,820 ccw(c1595,805) 1580,805 1580,735
GND on L4 "GND_L04_P018" (solid, pour order 18): 0,125 ccw(c125,125) 125,0 1920,0 ccw(c1920,125) 2045,125 2045,2975 ccw(c1920,2975) 1920,3100 125,3100 ccw(c124.99,2975.01) 0,2975
GND on L2 "GND_L02_P017" (solid, pour order 17): 0,125 ccw(c125,125) 125,0 1920,0 ccw(c1920,125) 2045,125 2045,2975 ccw(c1920,2975) 1920,3100 125,3100 ccw(c124.99,2975.01) 0,2975

## Keep-outs
L3:
  circle w10: c340,1450 r40.35
  lines w12: 1555,570 cw(c1435.04,573.27) 1555.04,573.27

## Silkscreen, mask and mechanical layers (free items; w line width, h text height)
Top Solder:
  lines w50: 45,305 45,333.78 45,462.52 45,591.26 45,720 45,848.74 45,977.48 45,1106.22 45,1234.96 45,1363.7 45,1492.44 45,1621.18 45,1749.92 45,1878.66 45,2007.4 45,2136.14 45,2264.88 45,2393.62 45,2522.36 45,2651.1 45,2779.84 ; 301.17,48.83 348.77,48.83 352.6,45 1195,45 ; 1080,3055 1208.74,3055 ; 2005,305.25 2005,334.02 2005,462.76 2005,591.5 2005,720.24 2005,848.98 2005,977.72 2005,1106.47 2005,1235.21 2005,1363.95 2005,1492.69 2005,1621.43 2005,1750.17 2005,1878.91 2005,2007.65 2005,2136.39 2005,2265.13 2005,2393.87 2005,2522.61 2005,2651.35 2005,2780.09
Board Shape:
  the board outline again, w1

## Text inside footprints (layer, text, board x,y; h text height)
D2: Mechanical 13 "*" at 1347.5,2978 h20
U1: Mechanical 13 "*" at 365,1187.5 h20 r90; Top Overlay "*" at 305,1137.5 h20 r90
U3: Top Overlay "*" at 1240,1465 h20 r90